# Altium PCB Copy of TQ210_BOARD_V4-20121031.PcbDoc (part 1 of 8)
Units mm, origin at the board's own origin, x right, y up, seen from the top; angles counter-clockwise.
Board outline 191.2 x 131.27 mm, 2 copper layers (TopLayer, BottomLayer); 362 components, 455 nets, 1594 pads, 630 vias.
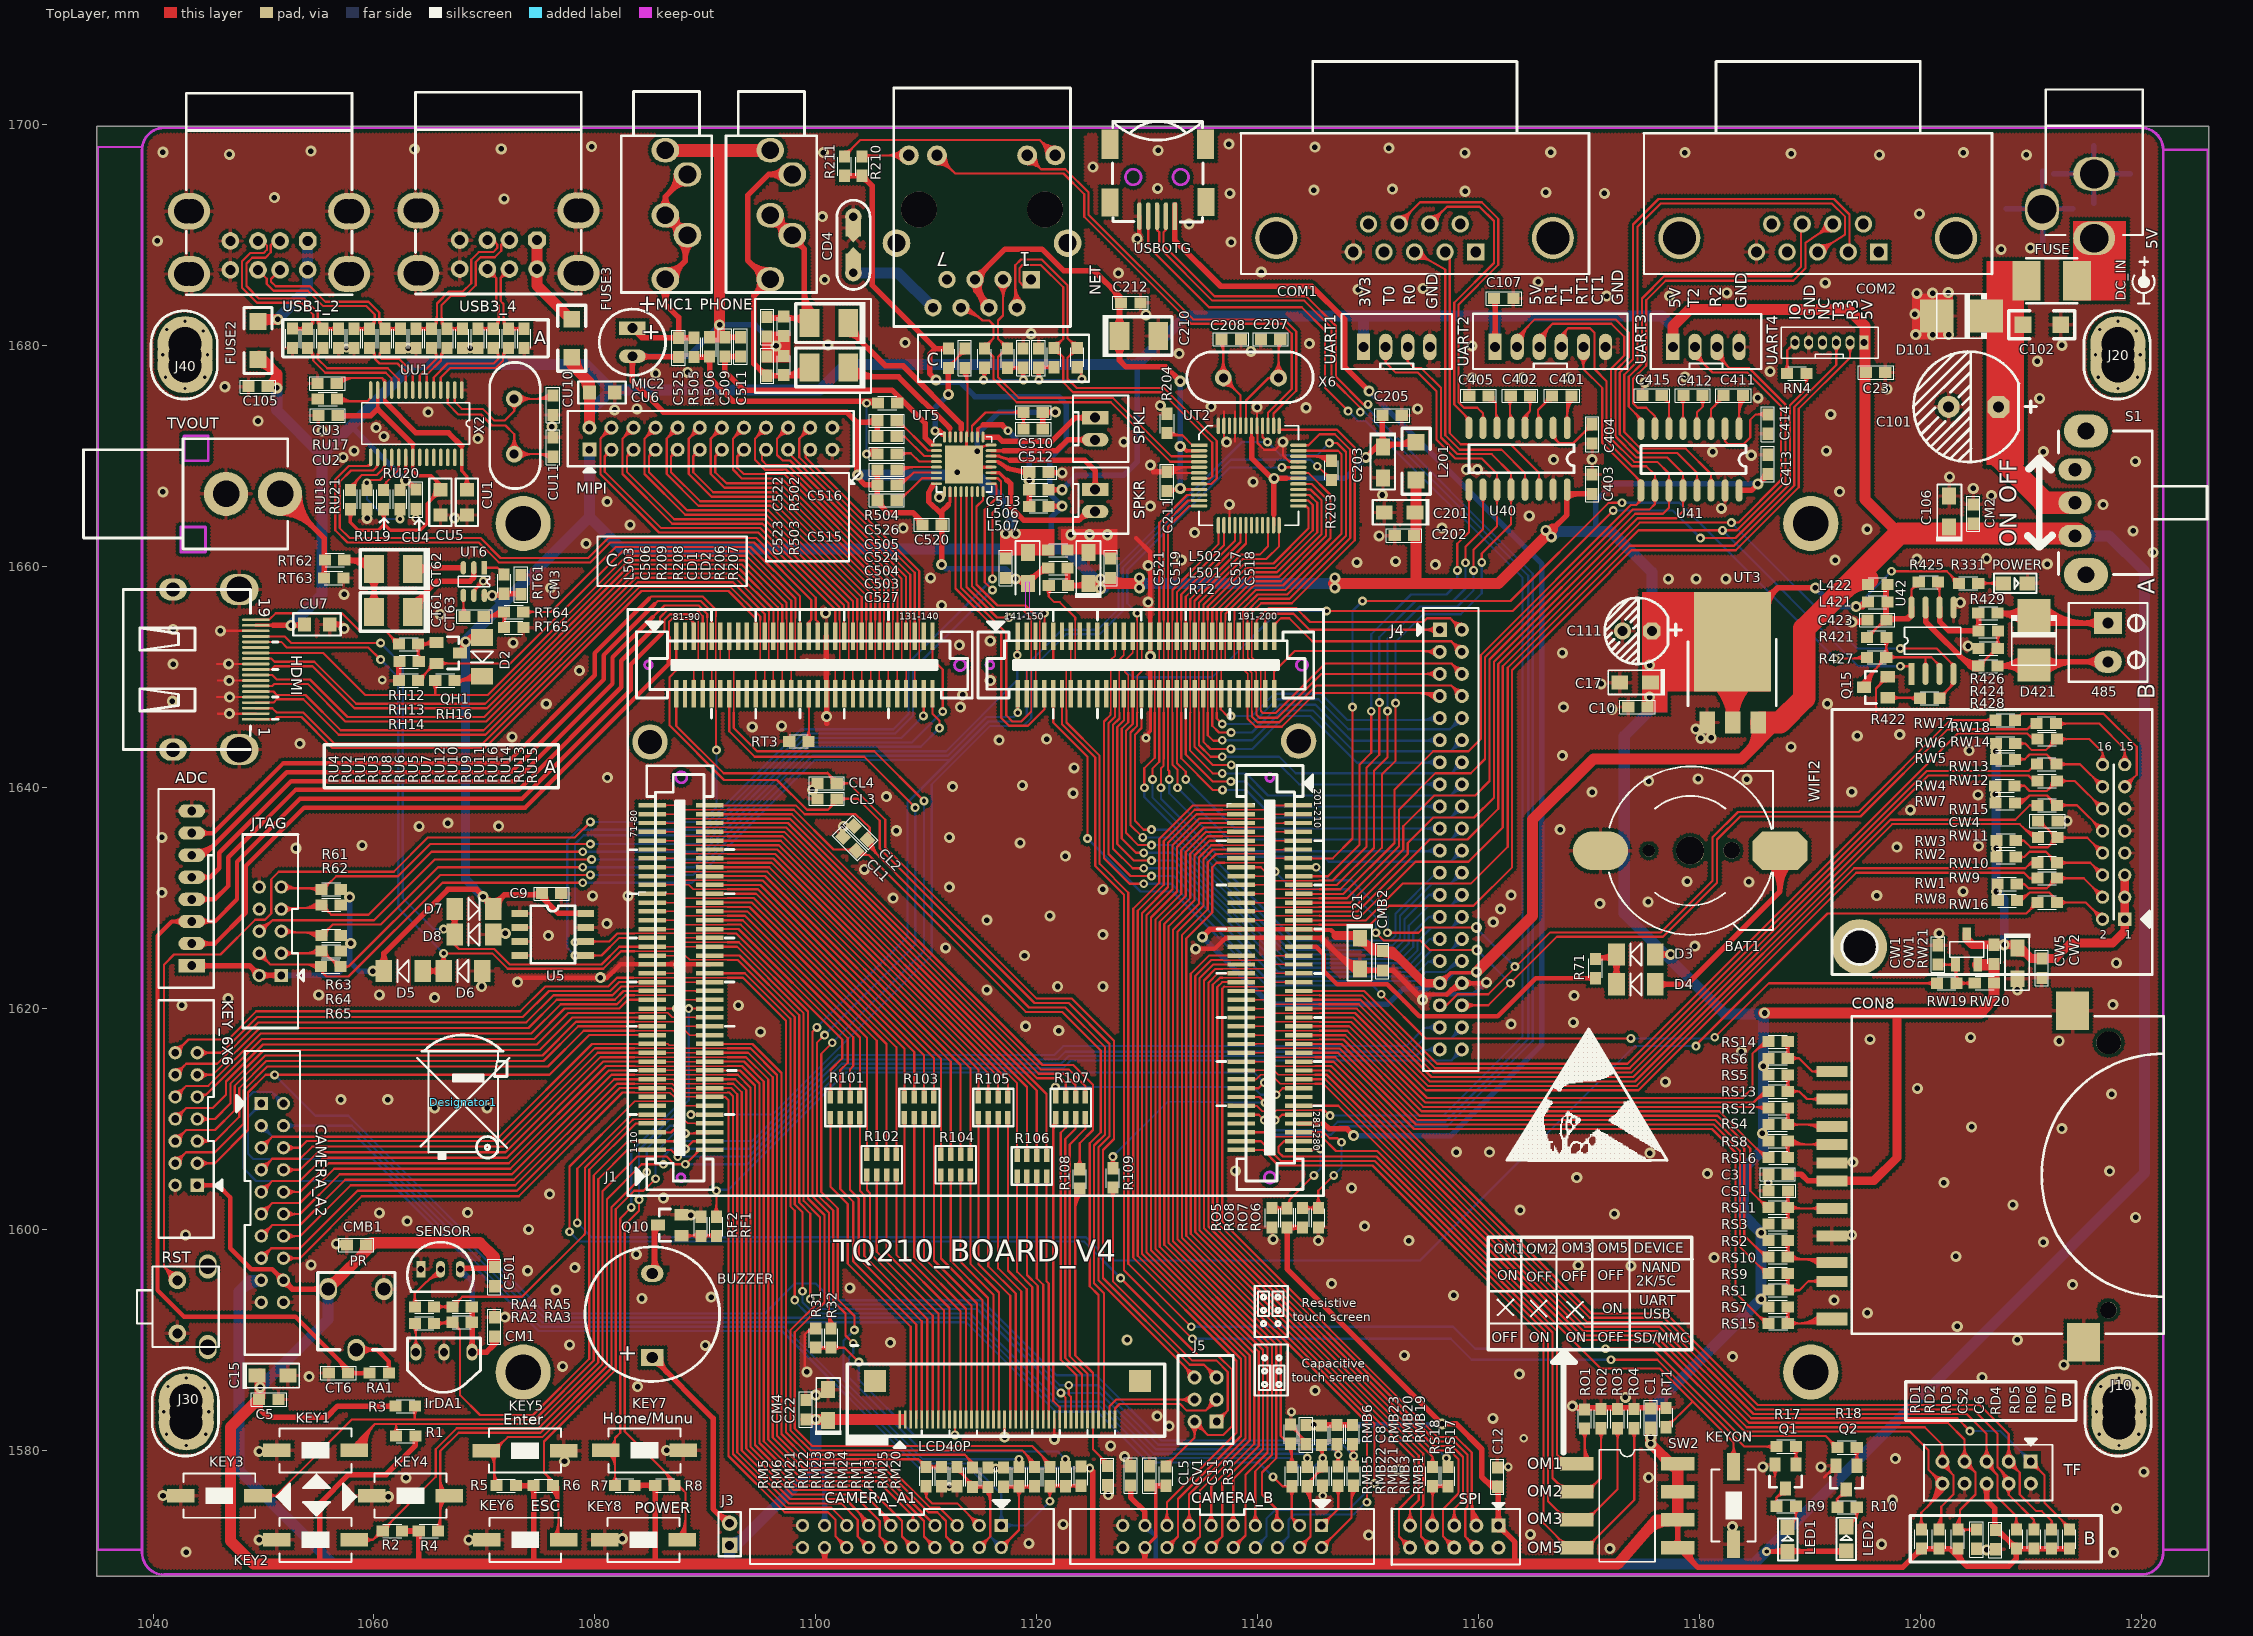
[diagram p0: TopLayer view]
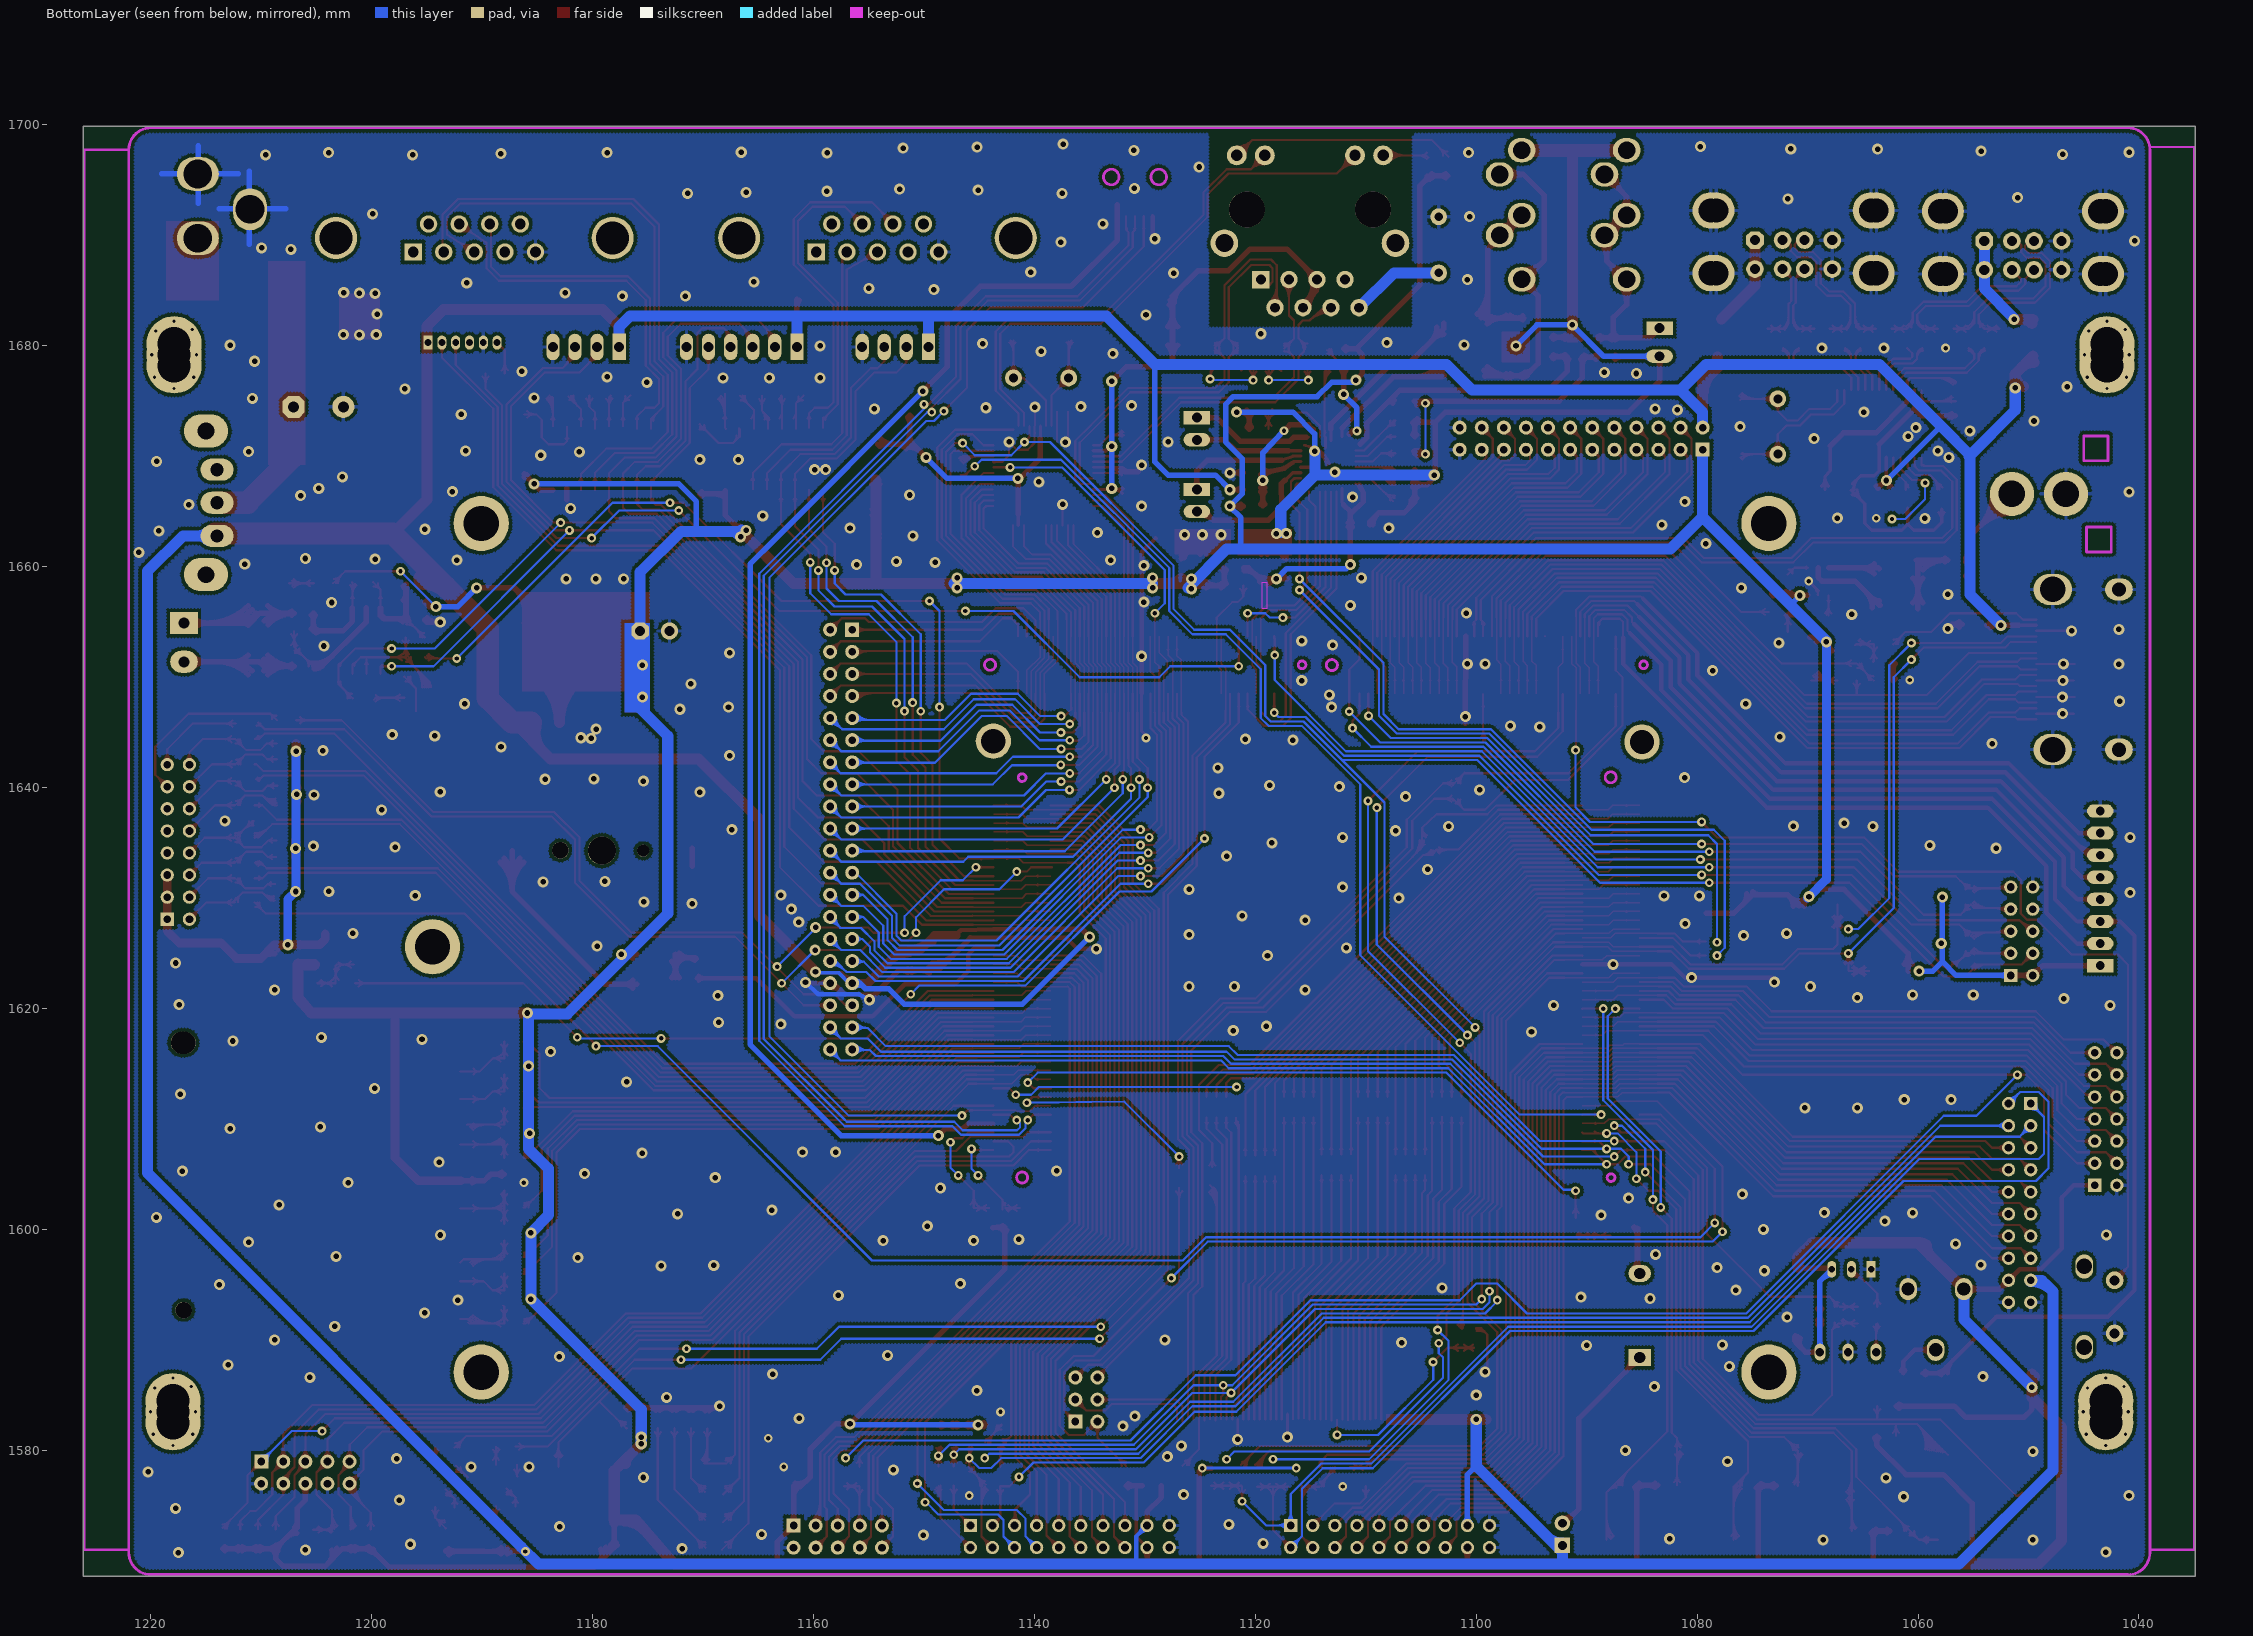
[diagram p1: BottomLayer view, seen from below]

## Layer stack, top to bottom
TopSolder: solder mask 0.0102, Solder Resist, Dk 3.5
TopLayer: signal copper 0.0356
Dielectric1: dielectric 0.32, FR-4, Dk 4.8
BottomLayer: signal copper 0.0356
BottomSolder: solder mask 0.0102, Solder Resist, Dk 3.5

## Board outline
1034.9,1568.607 1226.1,1568.607 1226.1,1699.877 1034.9,1699.877

## Design rules (kind name [scope] priority, off if disabled: settings)
AssemblyTestPointUsage [All] p0: scope1count=1 scope1_0_kind=Board scope1_0_value=Board scope2count=1 scope2_0_kind=Board scope2_0_value=Board commentlength=0
AssemblyTestpoint [All] p0: scope1count=1 scope1_0_kind=Board scope1_0_value=Board scope2count=1 scope2_0_kind=Board scope2_0_value=Board commentlength=0
Clearance [All] p0: scope1count=1 scope1_0_kind=Board scope1_0_value=Board scope2count=1 scope2_0_kind=Board scope2_0_value=Board commentlength=0 gap=0.102
Clearance Clearance_2 [All] p0 off: scope1count=1 scope1_0_kind=Board scope1_0_value=Board scope2count=1 scope2_0_kind=Board scope2_0_value=Board commentlength=0 gap=0.2
Clearance Clearance_1 [All] p0 off: scope1count=1 scope1_0_kind=Board scope1_0_value=Board scope2count=1 scope2_0_kind=Board scope2_0_value=Board commentlength=47 gap=0.3 // Protel DXP Scope 1 Expression Was: (InPoly)
Clearance Clearance_1 [(InPoly)] p1: gap=0.3 ignorepadtopadclearanceinfootprint=FALSE
Clearance Clearance_2 [All] p2 off: gap=0.2 ignorepadtopadclearanceinfootprint=FALSE
Clearance [All] p3: gap=0.102 ignorepadtopadclearanceinfootprint=FALSE
ComponentClearance [All] p0 off: scope1count=1 scope1_0_kind=Board scope1_0_value=Board scope2count=1 scope2_0_kind=Board scope2_0_value=Board commentlength=0 gap=0.254 collisioncheckmode=3
ComponentClearance [All] p1 off: gap=0.254 collisioncheckmode=3 verticalgap=0.254 showdistances=FALSE
DiffPairsRouting [All] p0: scope1count=1 scope1_0_kind=Board scope1_0_value=Board scope2count=1 scope2_0_kind=Board scope2_0_value=Board commentlength=0
FabricationTestPointUsage TestPointUsage [All] p0: scope1count=1 scope1_0_kind=Board scope1_0_value=Board scope2count=1 scope2_0_kind=Board scope2_0_value=Board commentlength=0 valid=0 allowmultiple=FALSE
FabricationTestPointUsage TestPointUsage [All] p1: valid=0 allowmultiple=FALSE
FabricationTestpoint Testpoint [All] p0: scope1count=1 scope1_0_kind=Board scope1_0_value=Board scope2count=1 scope2_0_kind=Board scope2_0_value=Board commentlength=0 side=3 testpointundercomponent=TRUE minsize=1.016 maxsize=2.54 preferedsize=1.524 minholesize=0.508 maxholesize=1.016 preferedholesize=0.813 testpointgrid=0.025
FabricationTestpoint Testpoint [All] p1: side=3 testpointundercomponent=TRUE minsize=1.016 maxsize=2.54 preferedsize=1.524 minholesize=0.508 maxholesize=1.016 preferedholesize=0.813 testpointgrid=0.025 allowsidetop=TRUE allowsidebottom=TRUE usegrid=TRUE gridtolerance=0
FanoutControl Fanout_BGA [All] p0 off: scope1count=1 scope1_0_kind=Board scope1_0_value=Board scope2count=1 scope2_0_kind=Board scope2_0_value=Board commentlength=69 // Protel DXP Scope 1 Expression Was: IsBGA   Fanout_BGA (Default Rule)
FanoutControl Fanout_LCC [All] p0 off: scope1count=1 scope1_0_kind=Board scope1_0_value=Board scope2count=1 scope2_0_kind=Board scope2_0_value=Board commentlength=69 // Protel DXP Scope 1 Expression Was: IsLCC   Fanout_LCC (Default Rule)
FanoutControl Fanout_SOIC [All] p0 off: scope1count=1 scope1_0_kind=Board scope1_0_value=Board scope2count=1 scope2_0_kind=Board scope2_0_value=Board commentlength=71 // Protel DXP Scope 1 Expression Was: IsSOIC   Fanout_SOIC (Default Rule)
FanoutControl Fanout_Small [All] p0 off: scope1count=1 scope1_0_kind=Board scope1_0_value=Board scope2count=1 scope2_0_kind=Board scope2_0_value=Board commentlength=84 // Protel DXP Scope 1 Expression Was: (CompPinCount < 5)   Fanout_Small (Default Rule)
FanoutControl Fanout_Default [All] p0: scope1count=1 scope1_0_kind=Board scope1_0_value=Board scope2count=1 scope2_0_kind=Board scope2_0_value=Board commentlength=30 // Fanout_Default (Default Rule)
Height [All] p0: scope1count=1 scope1_0_kind=Board scope1_0_value=Board scope2count=1 scope2_0_kind=Board scope2_0_value=Board commentlength=0
HoleSize [All] p0: scope1count=1 scope1_0_kind=Board scope1_0_value=Board scope2count=1 scope2_0_kind=Board scope2_0_value=Board commentlength=0 absolutevalues=TRUE maxlimit=8 minlimit=0.025 maxpercent=80.000 minpercent=20.000
HoleSize [All] p1: absolutevalues=TRUE maxlimit=8 minlimit=0.025 maxpercent=80.000 minpercent=20.000
HoleToHoleClearance [All] p0: scope1count=1 scope1_0_kind=Board scope1_0_value=Board scope2count=1 scope2_0_kind=Board scope2_0_value=Board commentlength=0
LayerPairs [All] p0: scope1count=1 scope1_0_kind=Board scope1_0_value=Board scope2count=1 scope2_0_kind=Board scope2_0_value=Board commentlength=0 enforce=TRUE
MinimumSolderMaskSliver [All] p0: scope1count=1 scope1_0_kind=Board scope1_0_value=Board scope2count=1 scope2_0_kind=Board scope2_0_value=Board commentlength=0
NetAntennae [All] p0: scope1count=1 scope1_0_kind=Board scope1_0_value=Board scope2count=1 scope2_0_kind=Board scope2_0_value=Board commentlength=0
PasteMaskExpansion [All] p0: scope1count=1 scope1_0_kind=Board scope1_0_value=Board scope2count=1 scope2_0_kind=Board scope2_0_value=Board commentlength=0 expansion=0
PlaneClearance [All] p0: scope1count=1 scope1_0_kind=Board scope1_0_value=Board scope2count=1 scope2_0_kind=Board scope2_0_value=Board commentlength=0 clearance=0.508
PlaneConnect [All] p0: scope1count=1 scope1_0_kind=Board scope1_0_value=Board scope2count=1 scope2_0_kind=Board scope2_0_value=Board commentlength=0 planeconnectstyle=Relief reliefexpansion=0.508 reliefentries=4 reliefconductorwidth=0.254 reliefairgap=0.254
PolygonConnect [All] p0: scope1count=1 scope1_0_kind=Board scope1_0_value=Board scope2count=1 scope2_0_kind=Board scope2_0_value=Board commentlength=0 connectstyle=Relief reliefconductorwidth=0.3 reliefentries=4 polygonreliefangle="90 Angle"
PolygonConnect [All] p1: connectstyle=Relief reliefconductorwidth=0.3 reliefentries=4 polygonreliefangle="90 Angle" airgapwidth=0.254
RoutingCorners [All] p0: scope1count=1 scope1_0_kind=Board scope1_0_value=Board scope2count=1 scope2_0_kind=Board scope2_0_value=Board commentlength=0 cornerstyle=45-Degree minsetback=2.54 maxsetback=2.54
RoutingLayers [All] p0: scope1count=1 scope1_0_kind=Board scope1_0_value=Board scope2count=1 scope2_0_kind=Board scope2_0_value=Board commentlength=0 top layer=Horizontal bottom layer=Vertical
RoutingPriority [All] p0: scope1count=1 scope1_0_kind=Board scope1_0_value=Board scope2count=1 scope2_0_kind=Board scope2_0_value=Board commentlength=0
RoutingTopology [All] p0: scope1count=1 scope1_0_kind=Board scope1_0_value=Board scope2count=1 scope2_0_kind=Board scope2_0_value=Board commentlength=0 topology=Shortest
RoutingVias [All] p0: scope1count=1 scope1_0_kind=Board scope1_0_value=Board scope2count=1 scope2_0_kind=Board scope2_0_value=Board commentlength=0 holewidth=0.711 width=1.27 viastyle="Through Hole" minholewidth=0.711 minwidth=1.27 maxholewidth=5 maxwidth=5
RoutingVias [All] p1: holewidth=0.711 width=1.27 viastyle="Through Hole" minholewidth=0.711 minwidth=1.27 maxholewidth=5 maxwidth=5
ShortCircuit [All] p0: scope1count=1 scope1_0_kind=Board scope1_0_value=Board scope2count=1 scope2_0_kind=Board scope2_0_value=Board commentlength=0 allowed=FALSE
SilkToBoardRegionClearance [All] p0: scope1count=1 scope1_0_kind=Board scope1_0_value=Board scope2count=1 scope2_0_kind=Board scope2_0_value=Board commentlength=0
SilkToSilkClearance [All] p0: scope1count=1 scope1_0_kind=Board scope1_0_value=Board scope2count=1 scope2_0_kind=Board scope2_0_value=Board commentlength=0
SilkToSolderMaskClearance [All] p0 off: scope1count=1 scope1_0_kind=Board scope1_0_value=Board scope2count=1 scope2_0_kind=Board scope2_0_value=Board commentlength=44 // Protel DXP Scope 1 Expression Was: IsPad
SolderMaskExpansion [All] p0: scope1count=1 scope1_0_kind=Board scope1_0_value=Board scope2count=1 scope2_0_kind=Board scope2_0_value=Board commentlength=0 expansion=0.102
SolderMaskExpansion [All] p1: expansion=0.102
UnRoutedNet [All] p0: scope1count=1 scope1_0_kind=Board scope1_0_value=Board scope2count=1 scope2_0_kind=Board scope2_0_value=Board commentlength=0
UnpouredPolygon [All] p0: scope1count=1 scope1_0_kind=Board scope1_0_value=Board scope2count=1 scope2_0_kind=Board scope2_0_value=Board commentlength=0
Width Width_7 [All] p0 off: scope1count=1 scope1_0_kind=Net scope1_0_value=VDD5V scope2count=1 scope2_0_kind=Board scope2_0_value=Board commentlength=0 maxlimit=0.5 minlimit=0.5 preferedwidth=0.5
Width Width_2 [All] p0 off: scope1count=1 scope1_0_kind=Net scope1_0_value=XMMC1DATA3 scope2count=1 scope2_0_kind=Board scope2_0_value=Board commentlength=0 maxlimit=0.5 minlimit=0.5 preferedwidth=0.5
Width [All] p0 off: scope1count=1 scope1_0_kind=Board scope1_0_value=Board scope2count=1 scope2_0_kind=Board scope2_0_value=Board commentlength=0 maxlimit=0.152 minlimit=0.127 preferedwidth=0.135
Width Width_1 [All] p0: scope1count=1 scope1_0_kind=Board scope1_0_value=Board scope2count=1 scope2_0_kind=Board scope2_0_value=Board commentlength=0 maxlimit=3 minlimit=0.2 preferedwidth=0.5
Width Width_2 [InNet('XMMC1DATA3')] p1 off: maxlimit=0.5 minlimit=0.5 preferedwidth=0.5
Width Width_7 [InNet('VDD5V')] p2 off: maxlimit=0.5 minlimit=0.5 preferedwidth=0.5
Width [All] p3 off: maxlimit=0.152 minlimit=0.127 preferedwidth=0.135
Width Width_1 [All] p4: maxlimit=3 minlimit=0.2 preferedwidth=0.5
26 further rules are at their usual default settings.

## Components (designator, comment, footprint, x,y, rotation, side; value= is the part's Value field where it differs from the comment)
485 "CON2_3.5" CN2-3.5-180 1217,1654.9 r90 top
ADC "CON8" DIP8_2.0 1043.5,1623.9 r90 top
BAT1 "BATTERY" BAT600 1187.3,1634.3 r90 top
BUZZER "BUZZER" BUZZER 1085.2,1588.4 r90 top
C1 "104" C_0603#1 1175.6,1582.05 r90 top
C3 "104" C_0603#1 1188,1605 r180 top
C5 "104" C_0603#1 1049.6,1584.6 r0 top
C6 "104" C_0603#1 1206.8,1572.8 r270 top
C8 "104" C_0603#2 1144.4,1582.3 r270 top
C9 "104" C_0603#1 1075.2,1630.4 r0 top
C10 "104" C_0603#2 1175.3,1647.3 r180 top
C11 "104" C_0603#3 1130.2,1576.8 r90 top
C12 "104" C_0603#3 1161.7,1576.7 r90 top
C15 "22uF/6.3V" 3216A#1 1049.4,1586.8 r0 top
C17 "10uF/16V" 3216A#1 1175.6,1649.5 r180 top
C21 "10uF/16V" 3216A#1 1149.278,1626.384 r270 top
C22 "10uF/16V" 3216A#2 1101.1,1582.7 r90 top
C23 "104" C_0603#4 1195.1,1677.6 r0 top
C101 "220uF/50V" 1000UF 1202.6,1674.5 r0 top
C102 "10uF/25V" 1206#1 1209.3,1681.9 r0 top
C105 "104" C_0603#3 1050.4,1676.3 r180 top
C106 "10uF/16V" 3216a 1202.6,1663.6 r90 top
C107 "104" C_0603#3 1161.4,1684.3 r0 top
C111 "220uF/16V" 47U1 1175.7,1654.2 r180 top
C201 "22uF/6.3V" 3216A#3 1154.266,1664.923 r180 top
C202 "104" C_0603#1 1154.166,1662.823 r180 top
C203 "22uF/6.3V" 3216A#3 1151.354,1670.848 r270 top
C205 "104" C_0603#1 1151.3,1673.7 r0 top
C207 "22pF" C_0603#1 1140.3,1680.6 r0 top
C208 "22pF" C_0603#1 1138.5,1680.6 r180 top
C210 "100uF/6.3V" C_1210#1 1127.5,1680.9 r0 top
C211 "22pF" C_0603#1 1131.8,1668.6 r270 top
C212 "104" C_0603#1 1129.4,1683.9 r180 top
C401 "104" C_0603#1 1166.669,1675.48 r0 top
C402 "104" C_0603#1 1164.669,1675.48 r180 top
C403 "104" C_0603#1 1170.3,1666.6 r90 top
C404 "104" C_0603#1 1170.3,1672.9 r270 top
C405 "104" C_0603#1 1160.919,1675.48 r180 top
C411 "104" C_0603#1 1182.2,1675.5 r0 top
C412 "104" C_0603#1 1180.3,1675.5 r180 top
C413 "104" C_0603#1 1186.2,1668.4 r90 top
C414 "104" C_0603#1 1186.2,1673.8 r270 top
C415 "104" C_0603#1 1176.6,1675.5 r180 top
C423 "104" C_0603#5 1195.2,1655.2 r0 top
C501 "104" C_0603#2 1070.9,1596.6 r270 top
C503 "1uF" C_0603#1 1107.328,1667.424 r180 top
C504 "1uF" C_0603#1 1107.329,1668.778 r180 top
C505 "1uF" C_0603#1 1107.329,1671.778 r180 top
C506 "104" C_0603#1 1113.5,1678 r90 top
C509 "1uF" C_0603#1 1091.781,1679.033 r90 top
C510 "1uF" C_0603#1 1118.808,1673.973 r0 top
C511 "104" C_0603#1 1093.181,1679.033 r90 top
C512 "104" C_0603#1 1118.808,1672.473 r0 top
C513 "104" C_0603#1 1119.328,1668.524 r0 top
C515 "100uF/6.3V" C_1210#1 1102.939,1678.054 r180 top
C516 "100uF/6.3V" C_1210#1 1102.939,1682.054 r180 top
C517 "22uF/6.3V" 3216A#3 1124.7,1658.5 r90 top
C518 "104" C_0603#1 1126.7,1659 r90 top
C519 "22uF/6.3V" 3216A#4 1119.2,1658.5 r90 top
C520 "104" C_0603#1 1111.4,1663.8 r180 top
C521 "104" C_0603#1 1117.2,1659 r90 top
C522 "220pF" C_0603#1 1095.6,1682.6 r270 top
C523 "220pF" C_0603#1 1095.6,1677.3 r90 top
C524 "1uF" C_0603#1 1107.328,1670.224 r180 top
C525 "220pF" C_0603#1 1087.574,1680.736 r270 top
C526 "1uF" C_0603#1 1107.328,1673.224 r180 top
C527 "1uF" C_0603#1 1107.328,1666.024 r180 top
CAMERA_A1 "CAM_2.0" IDC20S_2.0 1116.8,1573.2 r180 top
CAMERA_A2 "CAM_2.0" IDC20S_2.0 1049.8,1611.4 r270 top
CAMERA_B "CAM_2.0" IDC20S_2.0 1145.8,1573.2 r180 top
CD1 "104" C_0603#1 1118.777,1678.015 r90 top
CD2 "104" C_0603#1 1120.177,1678.015 r90 top
CD4 "102/1kv" RESD1 1103.4,1686.6 r90 top
CL1 "1nF(NC)" C_0603#6 1103.7,1634.3 r135 top
CL2 "1nF(NC)" C_0603#6 1104.7,1635.3 r135 top
CL3 "1nF(NC)" C_0603#6 1101.9,1639 r180 top
CL4 "1nF(NC)" C_0603#6 1101.9,1640.4 r180 top
CL5 "22pF" C_0603#1 1126.4,1578.6 r270 top
CM1 "104" C_0603#1 1070.9,1590.3 r90 top
CM2 "104" C_0603#1 1204.8,1663.9 r90 top
CM3 "104" C_0603#7 1073.3,1657.5 r90 top
CM4 "104" C_0603#7 1099.1,1582.8 r90 top
CMB1 "104" C_0603#1 1059.3,1598.6 r180 top
CMB2 "104" C_0603#1 1151.3,1625.2 r270 top
COM1 "BOXCONN_DB9" DB9RA/M 1159.75,1688.5 r180 top
COM2 "BOXCONN_DB9" DB9RA/M 1196.25,1688.5 r180 top
CON8 "SD/MMC CARD" SD-5011 1191.995,1611.805 r0 top locked
CS1 "22pF" C_0603#8 1188,1603.5 r180 top
CS2 "22pF" C_0603#8 1205.1,1572.819 r270 top
CT6 "104" C_0603#1 1055.9,1587 r0 top
CT61 "47uF/10V" C_1210#2 1063.5,1655.9 r180 top
CT62 "47uF/10V" C_1210#2 1063.5,1659.8 r180 top
CT63 "104" C_0603#9 1068.2,1655.5 r0 top
CU1 "10uF" 0805C#1 1068.4,1667 r0 top
CU2 "104" C_0603#8 1056.7,1673.7 r180 top
CU3 "104" C_0603#8 1054.9,1676.6 r0 top
CU4 "104" C_0603#1 1063.798,1666.997 r270 top
CU5 "10uF" 0805C#2 1066,1667 r0 top
CU6 "10uF" 0805C#3 1079.5,1675.8 r270 top
CU7 "10uF" 0805C#4 1053.7,1654.8 r270 top
CU10 "22pF" C_0603#8 1076.202,1673.769 r90 top
CU11 "22pF" C_0603#8 1076.2,1671.7 r270 top
CV1 "104" C_0603#3 1128.5,1576.8 r90 top
CW1 "1nF(NC)" C_0603#10 1201.6,1624 r90 top
CW2 "104" C_0603#10 1211,1622.8 r90 top
CW4 "22pF" C_0603#11 1212.4,1637 r180 top
CW5 "22uF/6.3V" 3216A#5 1208.8,1625.5 r270 top
D2 "1N4148" D1206 1069.8,1653.6 r270 top
D3 "1N4148" D1206 1176,1624.9 r180 top
D4 "1N4148" D1206 1176,1622.2 r180 top
D5 "1N4148" D1206 1064.4,1623.4 r180 top
D6 "1N4148" D1206 1069.8,1623.4 r180 top
D7 "1N4148" D1206 1067.3,1629 r0 top
D8 "1N4148" D1206 1070.8,1626.7 r180 top
D101 "SMBJ6.8A" SMBJ_SMD 1201.5,1682.7 r180 top
D421 "SMBJ6.8A" SMBJ_SMD 1210.3,1651.1 r270 top
DC_IN "DC-05-2.1" DC-JACK 1215.75,1689.75 r90 top
Designator1 "Comment" LAJITONG 1068.1,1611.5 r0 top
FUSE "2.6A" FUSE 1214.2,1685.9 r180 top
FUSE2 "2A" 1206#2 1049.5,1682.2 r270 top
FUSE3 "2A" 1206#1 1077.9,1682.4 r270 top
HDMI "HDMI_A" HDMI 1049.3,1646.2 r0 top
IrDA1 "HS0038B" IRM3638 1063.8,1588.9 r0 top
J1 "CON280" CON280_SMD_BOT 1085.2,1607.2 r0 top locked
J3 "CON2" SIP2_2.0 1092.2,1571.4 r90 top
J4 "HEADER 20X2" IDC40P_2.00 1156.5,1654.3 r270 top
J5 "CON6_DIP" CON6_2.0 1136.3,1582.6 r90 top
J10 "TP" DWK 1217.998,1583.497 r0 top locked
J20 "TP" DWK 1217.898,1679.197 r0 top locked
J30 "TP" DWK 1042.998,1583.497 r0 top locked
J40 "TP" DWK 1042.898,1679.197 r0 top locked
JTAG "HEADER 5X2" IDC10S 1051.6,1623 r90 top
KEY1 "KEY" SW-PB2 1058.2,1580 r270 top
KEY2 "KEY" SW-PB2 1058.2,1571.9 r270 top
KEY3 "KEY" SW-PB2 1049.5,1575.9 r270 top
KEY4 "KEY" SW-PB2 1066.8,1575.9 r270 top
KEY5 "KEY" SW-PB2 1070.176,1579.976 r90 top
KEY6 "KEY" SW-PB2 1077.2,1571.9 r270 top
KEY7 "KEY" SW-PB2 1081,1580 r90 top
KEY8 "KEY" SW-PB2 1087.9,1571.9 r270 top
KEY_6X6 "HEADER 7X2" IDC14S_2.0 1044,1604 r90 top
KEYON "KEY" SW-PB2 1183.098,1578.502 r0 top
L201 "10uH" 1206#2 1154.354,1667.848 r90 top
L421 "0R" R_0603#1 1195.3,1656.8 r0 top
L422 "0(NC)" R_0603#1 1195.3,1658.4 r0 top
L501 "0" R_0603#2 1122.8,1659.9 r180 top
L502 "0" R_0603#2 1122.8,1661.5 r180 top
L503 "F.B/120" R_0603#2 1112,1678 r90 top
L506 "0" R_0603#2 1119.328,1666.976 r0 top
L507 "0(NC)" R_0603#2 1119.328,1665.476 r0 top
LCD40P "LCD40P" FPC0.5-SMT-40P 1107.6,1582.8 r0 top
LED1 "" LED_0805#1 1187.991,1573.041 r270 top
LED2 "" LED_0805#1 1193.3,1573.1 r270 top
MIC1 "PJ-215-B" PJ-215-B 1086.385,1697.725 r270 top
MIC2 "MIC" MIC 1083.4,1681.6 r270 top
MIPI "CON24(NC)" IDC24P_2.0 1079.5,1670.6 r0 top locked
NET "HR911105A" HR911105A 1119.5,1686 r90 top
PHONE "PJ-215-B" PJ-215-B 1095.885,1697.725 r270 top
POWER "RED" LED_0805#2 1209.7,1658.5 r180 top
PR "3K" RP2 1060.9,1594.6 r270 top
Q1 "S8050" S9013SMD#1 1187.791,1576.541 r180 top
Q2 "S8050" S9013SMD#1 1193.3,1576.45 r180 top
Q10 "S8050" S9013SMD#1 1085.7,1600.4 r90 top
Q15 "S8050" S9013SMD#1 1194.9,1649.1 r90 top
QH1 "S8050" S9013SMD#2 1067.8,1652.2 r270 top
QW1 "AP2305GN(NC)" SOT23-3 1203.2,1624 r0 top
R1 "10K" R_0603#2 1062,1581.3 r0 top
R2 "10K" R_0603#2 1060.8,1572.7 r0 top
R3 "10K" R_0603#3 1063.692,1584.011 r180 top
R4 "10K" R_0603#2 1065.8,1572.7 r180 top
R5 "10K" R_0603#2 1071.1,1576.8 r0 top
R6 "10K" R_0603#2 1076.2,1576.8 r180 top
R7 "10K" R_0603#2 1081.824,1576.824 r0 top
R8 "10K" R_0603#2 1087.224,1576.824 r180 top
R9 "1K" R_0603#2 1186.991,1574.941 r0 top
R10 "1K" R_0603#2 1192.5,1574.85 r0 top
R17 "10K" R_0603#2 1186.991,1580.341 r0 top
R18 "10K" R_0603#2 1192.5,1580.25 r0 top
R31 "0" R_0603#2 1100,1589.3 r90 top
R32 "0(NC)" R_0603#2 1101.4,1589.3 r90 top
R33 "0(NC)" R_0603#2 1131.7,1576.8 r90 top
R61 "10K" R_0603#4 1057,1630.8 r180 top
R62 "10K" R_0603#4 1057,1629.4 r180 top
R63 "10K" R_0603#4 1057,1626.6 r180 top
R64 "10K" R_0603#4 1057,1625.2 r180 top
R65 "1K" R_0603#4 1055.2,1623.8 r0 top
R71 "10K" R_0603#2 1170.6,1624.5 r270 top
R101 "22R" 8P4R_0603 1104,1612 r270 top
R102 "22R" 8P4R_0603 1107.3,1606.8 r270 top
R103 "22R" 8P4R_0603 1110.7,1612 r270 top
R104 "22R" 8P4R_0603 1114,1606.8 r270 top
R105 "22R" 8P4R_0603 1117.4,1612 r270 top
R106 "22R" 8P4R_0603 1120.9,1606.7 r270 top
R107 "22R" 8P4R_0603 1124.411,1612 r270 top
R108 "22" R_0603#2 1123.9,1603.7 r90 top
R109 "22" R_0603#2 1126.9,1603.8 r90 top
R203 "0" R_0603#2 1146.7,1669.6 r270 top
R204 "6.8K(1%)" R_0603#2 1131.8,1672.1 r90 top
R206 "51" R_0603#2 1121.577,1679.815 r270 top
R207 "51" R_0603#2 1123.677,1679.815 r270 top
R208 "51" R_0603#2 1117.377,1678.015 r90 top
R209 "51" R_0603#2 1115.277,1678.015 r90 top
R210 "1K" R_0603#2 1102.6,1695.4 r90 top
R211 "1K" R_0603#2 1104.2,1695.4 r90 top
R331 "1K" R_0603#5 1203.5,1658.5 r0 top
R421 "5.1K" R_0603#1 1195.2,1653.6 r0 top
R422 "1K" R_0603#1 1200,1648.1 r0 top
R424 "2K" R_0603#1 1207,1652.6 r180 top
R425 "2K" R_0603#1 1201.6,1658.6 r180 top
R426 "120" R_0603#1 1205.3,1654.2 r0 top
R427 "0(NC)" R_0603#1 1196.9,1651.8 r180 top
R428 "22" R_0603#2 1207,1651 r180 top
R429 "22" R_0603#2 1207,1655.8 r180 top
R502 "47K" R_0603#2 1097.1,1680.9 r90 top
R503 "47K" R_0603#2 1097.1,1679.1 r270 top
R504 "2.2K" R_0603#2 1105.628,1674.824 r0 top
R505 "0" R_0603#2 1088.981,1680.733 r270 top
R506 "47K(NC)" R_0603#2 1090.381,1679.033 r90 top
RA1 "100" R_0603#2 1059.6,1587 r0 top
RA2 "0" R_0603#2 1063.7,1591.5 r0 top
RA3 "10K" R_0603#2 1067.1,1591.6 r0 top
RA4 "0" R_0603#2 1063.7,1593 r0 top
RA5 "10K" R_0603#2 1067.1,1593 r0 top
RD1 "10K" R_0603#2 1200.1,1571.1 r90 top
RD2 "10K" R_0603#2 1201.7,1571.1 r90 top
RD3 "10K" R_0603#2 1203.4,1571.1 r90 top
RD4 "10K" R_0603#2 1208.7,1571.1 r90 top
RD5 "10K" R_0603#2 1210.3,1571.1 r90 top
RD6 "10K" R_0603#2 1211.9,1571.1 r90 top
RD7 "10K" R_0603#2 1213.5,1571.1 r90 top
RF1 "100" R_0603#5 1091,1599.4 r90 top
RF2 "5.1K" R_0603#5 1089.6,1599.4 r90 top
RH12 "10K" R_0603#5 1064,1653 r180 top
RH13 "10K" R_0603#5 1062.3,1651.4 r0 top
RH14 "100K" R_0603#5 1064,1649.7 r180 top
RH16 "1.5K" R_0603#2 1067.3,1649.7 r180 top
RM1 "0(NC)" R_0603#2 1119.8,1576.748 r90 top
RM3 "0(NC)" R_0603#2 1121.2,1576.748 r90 top
RM5 "0" R_0603#2 1110,1578.5 r270 top
RM6 "10K" R_0603#2 1111.4,1578.5 r270 top
RM19 "4.7K" R_0603#5 1117,1578.448 r270 top
RM20 "4.7K" R_0603#5 1124,1578.548 r270 top
RM21 "10K" R_0603#5 1112.8,1576.752 r90 top
RM22 "0" R_0603#2 1114.2,1578.448 r270 top
RM23 "10K(NC)" R_0603#2 1115.6,1578.448 r270 top
RM24 "0" R_0603#2 1118.4,1576.748 r90 top
RM25 "0" R_0603#2 1122.6,1576.748 r90 top
RMB1 "0" R_0603#2 1148.7,1576.8 r90 top
RMB3 "0" R_0603#2 1147.3,1576.8 r90 top
RMB5 "0" R_0603#2 1143.1,1578.5 r270 top
RMB6 "10K" R_0603#2 1143,1580.6 r90 top
RMB19 "4.7K(NC)" R_0603#2 1148.6,1582.3 r270 top
RMB20 "4.7K(NC)" R_0603#2 1147.2,1582.3 r270 top
RMB21 "10K" R_0603#2 1145.9,1576.8 r90 top
RMB22 "0" R_0603#2 1144.5,1578.5 r270 top
RMB23 "10K(NC)" R_0603#2 1145.8,1580.5 r90 top
RN4 "0" R_0603#2 1189.7,1677.5 r180 top
RO1 "10K" R_0603#3 1169.611,1583.708 r270 top
RO2 "10K" R_0603#3 1171.111,1582.008 r90 top
RO3 "10K" R_0603#3 1172.611,1582.008 r90 top
RO4 "10K" R_0603#3 1174.111,1582.008 r90 top
RO5 "10K" R_0603#6 1141.3,1600.172 r90 top
RO6 "10K" R_0603#6 1145.5,1600.172 r90 top
RO7 "10K(NC)" R_0603#7 1144.1,1601.922 r270 top
RO8 "10K(NC)" R_0603#7 1142.7,1601.9 r270 top
RS1 "10K" R_0603#2 1186.25,1594.5 r0 top
RS2 "10K" R_0603#2 1186.25,1599 r0 top
RS3 "10K" R_0603#2 1186.25,1600.5 r0 top
RS4 "10K" R_0603#2 1186.25,1609.5 r0 top
RS5 "10K" R_0603#2 1186.25,1614 r0 top
RS6 "10K" R_0603#2 1186.25,1615.5 r0 top
RS7 "10K" R_0603#2 1186.25,1593 r0 top
RS8 "10K" R_0603#2 1186.25,1608 r0 top
RS9 "22" R_0603#2 1186.25,1596 r0 top
RS10 "22" R_0603#2 1186.25,1597.5 r0 top
RS11 "22" R_0603#2 1186.25,1602 r0 top
RS12 "22" R_0603#2 1186.25,1611 r0 top
RS13 "22" R_0603#2 1186.25,1612.5 r0 top
RS14 "22" R_0603#2 1186.25,1617 r0 top
RS15 "22" R_0603#2 1188,1591.5 r180 top
RS16 "22" R_0603#2 1188,1606.5 r180 top
RS17 "0" R_0603#2 1157.25,1578.5 r270 top
RS18 "0(NC)" R_0603#2 1155.85,1578.5 r270 top
RST "KEY" RST_KEY 1042.2,1590.6 r90 top
RT1 "0(NC)" R_0603#2 1177,1582.1 r90 top
RT2 "0(NC)" R_0603#2 1121.1,1658.3 r0 top
RT3 "10K" R_0603#2 1097.6,1644.2 r0 top
RT61 "4.7K" R_0603#8 1071.8,1659.3 r270 top
RT62 "75" R_0603#8 1057.3,1660.6 r180 top
RT63 "75" R_0603#8 1055.5,1659 r0 top
RT64 "0" R_0603#8 1073.5,1655.9 r180 top
RT65 "75" R_0603#8 1071.79,1654.5 r0 top
RU1 "22" R_0603#2 1055.4,1679.8 r90 top
RU2 "22" R_0603#2 1054,1679.8 r90 top
RU3 "15K" R_0603#2 1056.8,1679.8 r90 top
RU4 "15K" R_0603#2 1052.62,1679.815 r90 top
RU5 "22" R_0603#2 1061,1679.8 r90 top
RU6 "22" R_0603#2 1059.6,1679.8 r90 top
RU7 "15K" R_0603#2 1062.4,1679.8 r90 top
RU8 "15K" R_0603#2 1058.2,1679.8 r90 top
RU9 "22" R_0603#2 1066.6,1679.8 r90 top
RU10 "22" R_0603#2 1065.2,1679.8 r90 top
RU11 "15K" R_0603#2 1068,1679.8 r90 top
RU12 "15K" R_0603#2 1063.8,1679.8 r90 top
RU13 "22" R_0603#2 1072.2,1679.8 r90 top
RU14 "22" R_0603#2 1070.8,1679.8 r90 top
RU15 "15K" R_0603#2 1073.6,1679.8 r90 top
RU16 "15K" R_0603#2 1069.4,1679.8 r90 top
RU17 "2.7K (1%)" R_0603#7 1056.632,1675.159 r180 top
RU18 "100K" R_0603#2 1057.865,1666.958 r270 top
RU19 "100K" R_0603#2 1060.865,1666.958 r270 top
RU20 "47K" R_0603#2 1062.365,1666.958 r270 top
RU21 "100K" R_0603#2 1059.365,1666.958 r270 top
RW1 "10K" R_0603#2 1206.993,1631.269 r0 top
RW2 "10K" R_0603#2 1206.893,1633.719 r0 top
RW3 "10K" R_0603#2 1206.893,1635.219 r0 top
RW4 "10K" R_0603#2 1206.793,1640.169 r0 top
RW5 "10K" R_0603#2 1206.843,1642.569 r0 top
RW6 "10K" R_0603#2 1206.85,1644 r0 top
RW7 "10K" R_0603#9 1206.8,1638.6 r0 top
RW8 "10K" R_0603#9 1206.993,1629.769 r0 top
RW9 "22" R_0603#9 1210.6,1631.8 r0 top
RW10 "22" R_0603#9 1210.6,1633.2 r0 top
RW11 "22" R_0603#9 1210.643,1635.469 r0 top
RW12 "22" R_0603#9 1210.6,1640.6 r0 top
RW13 "22" R_0603#9 1210.563,1642.122 r0 top
RW14 "22" R_0603#9 1210.6,1644.4 r0 top
RW15 "22" R_0603#9 1210.6,1638.4 r0 top
RW16 "22" R_0603#9 1210.6,1629.6 r0 top
RW17 "22" R_0603#6 1208.6,1646.1 r180 top
RW18 "22" R_0603#6 1212.3,1645.8 r180 top
RW19 "4.7K(NC)" R_0603#6 1201.5,1622.3 r0 top
RW20 "4.7K(NC)" R_0603#6 1206.7,1622.3 r180 top
RW21 "0" R_0603#6 1206.7,1625.8 r270 top
S1 "SW SPDT" SW 1214,1662.8 r90 top
SENSOR "DS18B20" TO-92 1067.3,1596.4 r180 top
SPI "10P" IDC10P_2.00 1161.8,1573.2 r180 top
SPKL "CON-2" DIP2_2.0 1125.3,1673.5 r270 top
SPKR "CON-2" DIP2_2.0 1125.3,1667 r270 top
SW2 "NHDS_4" NHDS_4_2.54 1168.9,1578.8 r0 top
TF "10P" IDC10P_2.00 1210,1579 r180 top
TVOUT "AV-8.4-5A" TV 1051.5,1666.6 r0 top
U5 "AT24C02A" SOP-8 1073.2,1628.6 r0 top
U40 "SP3232EEN" SSOP16#1 1168.024,1672.577 r270 top
U41 "SP3232EEN" SSOP16#2 1183.6,1672.5 r270 top
U42 "MAX3485" SOP8 1199.2,1650.3 r90 top
UART1 "CON4" DIP4_2.0 1149.6,1679.9 r0 top
UART2 "CON6" DIP6_2.0 1161.5,1679.9 r0 top
UART3 "CON4" DIP4_2.0 1177.6,1679.9 r0 top
UART4 "CON6" DIP6_1.25 1194.9,1680.3 r180 top
USB1_2 "USB A/F" USBA_2 1054,1689.5 r180 top
USB3_4 "USB A/F" USBA_2 1074.766,1689.576 r180 top
USBOTG "MINIUSB" MINIUSB 1132.5,1691.75 r90 top
UT2 "DM9000AE" DM9000AE 1134.703,1671.004 r270 top
UT3 "AP1117-3.3" TO-252 1180.7,1645.9 r0 top
UT5 "WM8960GEFL" WM8960 1110.928,1671.024 r0 top
UT6 "NJM2561F1" NJM2561F1 1070,1659.9 r270 top
UU1 "FE1.1S" SSOP-28 1067.95,1676 r270 top
WIFI2 "CON16" IDC16_DIP_B 1218.5,1628.1 r0 top locked
X2 "12M" OSC2PR-1 1072.7,1670.2 r90 top
X6 "25M" OSC2PR-1 1141.9,1677.1 r180 top
? "" WEN 1170,1612 r0 top

## Footprints (in the part's own frame and the unit in brackets; to place one, negate y for a bottom-side part, rotate by r counter-clockwise, add the part's x,y. Pads: shape width x height; smd on the part's side, far side on the other; paste and mask are expansions set on the pad)
8P4R_0603 [mm]
  rect 1.2x0.5 smd: 1(0,0) 2(0,-0.889) 3(0,-1.778) 4(0,-2.667) 5(1.874,-2.667) 6(1.874,-1.778) 7(1.874,-0.889) 8(1.874,0)
  silkscreen extent -0.75,-3.15 2.65,0.5
47U1 [mil]
  oct 62x62 hole 35.43: 1(0.24,0.56)
  round 62 hole 35.43: 2(104.49,0.56)
  silkscreen extent -104,-117 168,119
0805C#1 [mm]
  rect 1.3x1.2 smd: 1(0.019,-0.027) 2(0.019,-2.313)
  silkscreen extent -0.99,-3.31 1.01,0.99
0805C#2 [mm]
  rect 1.3x1.2 smd: 1(0.018,-0.022) 2(0.018,-2.308)
  silkscreen extent -0.99,-3.3 1.01,1
0805C#3 [mm]
  rect 1.3x1.2 smd: 1(0.018,0.022) 2(0.018,2.308)
  silkscreen extent -0.99,-1 1.01,3.3
0805C#4 [mm]
  rect 1.3x1.2 smd: 1(0.021,0.018) 2(0.021,2.304)
  silkscreen extent -0.98,-1 1.02,3.3
1000UF [mm]
  oct 2x2 hole 1: 1(4.473,-0.015)
  round 2 hole 1: 2(-0.027,-0.015)
  silkscreen extent -3.2,-5.02 7.89,4.98
1206#1 [mil]
  rect 60x60 smd: 1(-0.21,0.39) 2(134.79,0.39)
  silkscreen extent -50,-50 185,50
1206#2 [mil]
  rect 60x60 smd: 1(0,0) 2(135,0)
  silkscreen extent -50,-50 185,50
3216A#1 [mil]
  rect 60x50 smd: 1(0.46,-0.58) 2(110.46,-0.58)
  silkscreen extent -51,-48 152,46
3216A#2 [mil]
  rect 60x50 smd: 1(0.35,-0.6) 2(110.35,-0.6)
  silkscreen extent -51,-48 151,46
3216A#3 [mil]
  rect 60x50 smd: 1(0,0) 2(110,0)
  silkscreen extent -51,-48 151,46
3216A#4 [mil]
  rect 60x50 smd: 1(0,0) 2(110,0)
  KeepOutLayer region: -90.23,8.85 -90.23,-7.61 3.77,-7.61 3.77,8.85
  silkscreen extent -40,-43 151,44
3216A#5 [mil]
  rect 60x50 smd: 1(0.2,-0.39) 2(110.2,-0.39)
  silkscreen extent -51,-48 151,46
3216a [mil]
  rect 60x50 smd: 1(0.35,-0.6) 2(110.35,-0.6)
  silkscreen extent -51,-48 151,46
BAT600 [mm]
  round 1.1 hole 1.1: 0(0,11.878)
  round 2.54 hole 2.54: 0(0,8.128)
  round 1.5 hole 1.5: 0(0.025,4.378)
  oct 3.5x5 smd: 1(0,0)
  oval 3.5x5 smd: 2(0,16.256)
  silkscreen extent -7.62,0.63 7.62,15.49
BUZZER [mil]
  rect 60x80 hole 40: 1(0,0)
  oval 60x80 hole 40: 2(300,0)
  silkscreen extent -85,-240 395,240
C_0603#1 [mm]
  rect 1.1x1 smd: 1(0,0) 2(1.75,0)
  silkscreen extent -0.7,-0.6 2.5,0.6
C_0603#2 [mm]
  rect 1.1x1 smd: 1(-0.011,-0.005) 2(1.739,-0.005)
  silkscreen extent -0.71,-0.61 2.49,0.59
C_0603#3 [mm]
  rect 1.1x1 smd: 1(0.01,-0.01) 2(1.76,-0.01)
  silkscreen extent -0.69,-0.61 2.51,0.59
C_0603#4 [mm]
  rect 1.1x1 smd: 1(-0.02,-0.014) 2(1.73,-0.014)
  silkscreen extent -0.72,-0.61 2.48,0.59
C_0603#5 [mm]
  rect 1.1x1 smd: 1(0.01,-0.013) 2(1.76,-0.013)
  silkscreen extent -0.69,-0.61 2.51,0.59
C_0603#6 [mm]
  rect 1.1x1 smd: 1(0.003,0.007) 2(1.753,0.007)
  silkscreen extent -0.7,-0.59 2.5,0.61
C_0603#7 [mm]
  rect 1.1x1 smd: 1(0.011,-0.002) 2(1.761,-0.002)
  silkscreen extent -0.69,-0.6 2.51,0.6
C_0603#8 [mm]
  rect 1.1x1 smd: 1(-0.019,0.002) 2(1.731,0.002)
  silkscreen extent -0.72,-0.6 2.48,0.6
C_0603#9 [mm]
  rect 1.1x1 smd: 1(-0.01,0.006) 2(1.74,0.006)
  silkscreen extent -0.71,-0.59 2.49,0.61
C_0603#10 [mm]
  rect 1.1x1 smd: 1(-0.015,-0.005) 2(1.735,-0.005)
  silkscreen extent -0.72,-0.6 2.48,0.6
C_0603#11 [mm]
  rect 1.1x1 smd: 1(-0.015,0.005) 2(1.735,0.005)
  silkscreen extent -0.72,-0.6 2.48,0.6
C_1210#1 [mil]
  rect 70x100 smd: 1(0,0) 2(137.8,0)
  silkscreen extent -61,-75 187,75
C_1210#2 [mil]
  rect 70x100 smd: 1(-0.24,-0.33) 2(137.56,-0.33)
  silkscreen extent -61,-75 187,74
CN2-3.5-180 [mm]
  rect 2x2.5 hole 1: 1(0,0)
  oval 2x2.5 hole 1: 2(-3.5,0)
  silkscreen extent -5.3,-3.57 1.81,3.55
CON6_2.0 [mm]
  rect 1.27x1.27 hole 0.711: 1(0,0)
  round 1.27 hole 0.711: 2(0,2) 3(2,0) 4(2,2) 5(4,0) 6(4,2)
  silkscreen extent -2,-1.5 6,3.5
CON280_SMD_BOT [mm]
  round 3.2 hole 2.2: 0(-0.203,36.939) 0(58.522,37.015)
  rect 2.5x0.4 smd: 1(0,0) 2(5.2,0) 3(0,0.8) 4(5.2,0.8) 5(0,1.6) 6(5.2,1.6) 7(0,2.4) 8(5.2,2.4) 9(0,3.2) 10(5.2,3.2) 11(0,4) 12(5.2,4) 13(0,4.8) 14(5.2,4.8) 15(0,5.6) 16(5.2,5.6) 17(0,6.4) 18(5.2,6.4) 19(0,7.2) 20(5.2,7.2) 21(0,8) 22(5.2,8) 23(0,8.8) 24(5.2,8.8) 25(0,9.6) 26(5.2,9.6) 27(0,10.4) 28(5.2,10.4) 29(0,11.2) 30(5.2,11.2) 31(0,12) 32(5.2,12) 33(0,12.8) 34(5.2,12.8) 35(0,13.6) 36(5.2,13.6) 37(0,14.4) 38(5.2,14.4) 39(0,15.2) 40(5.2,15.2) 41(0,16) 42(5.2,16) 43(0,16.8) 44(5.2,16.8) 45(0,17.6) 46(5.2,17.6) 47(0,18.4) 48(5.2,18.4) 49(0,19.2) 50(5.2,19.2) 51(0,20) 52(5.2,20) 53(0,20.8) 54(5.2,20.8) 55(0,21.6) 56(5.2,21.6) 57(0,22.4) 58(5.2,22.4) 59(0,23.2) 60(5.2,23.2) 61(0,24) 62(5.2,24) 63(0,24.8) 64(5.2,24.8) 65(0,25.6) 66(5.2,25.6) 67(0,26.4) 68(5.2,26.4) 69(0,27.2) 70(5.2,27.2) 71(0,28) 72(5.2,28) 73(0,28.8) 74(5.2,28.8) 75(0,29.6) 76(5.2,29.6) 77(0,30.4) 78(5.2,30.4) 79(0,31.2) 80(5.2,31.2) 201(58.5,31.2) 202(53.3,31.2) 203(58.5,30.4) 204(53.3,30.4) 205(58.5,29.6) 206(53.3,29.6) 207(58.5,28.8) 208(53.3,28.8) 209(58.5,28) 210(53.3,28) 211(58.5,27.2) 212(53.3,27.2) 213(58.5,26.4) 214(53.3,26.4) 215(58.5,25.6) 216(53.3,25.6) 217(58.515,24.795) 218(53.315,24.795) 219(58.515,23.995) 220(53.315,23.995) 221(58.515,23.195) 222(53.315,23.195) 223(58.515,22.395) 224(53.315,22.395) 225(58.515,21.595) 226(53.315,21.595) 227(58.515,20.795) 228(53.315,20.795) 229(58.515,19.995) 230(53.315,19.995) 231(58.515,19.195) 232(53.315,19.195) 233(58.515,18.395) 234(53.315,18.395) 235(58.515,17.595) 236(53.315,17.595) 237(58.515,16.795) 238(53.315,16.795) 239(58.515,15.995) 240(53.315,15.995) 241(58.515,15.195) 242(53.315,15.195) 243(58.515,14.395) 244(53.315,14.395) 245(58.515,13.595) 246(53.315,13.595) 247(58.515,12.795) 248(53.315,12.795) 249(58.515,11.995) 250(53.315,11.995) 251(58.515,11.195) 252(53.315,11.195) 253(58.515,10.395) 254(53.315,10.395) 255(58.515,9.595) 256(53.315,9.595) 257(58.515,8.795) 258(53.315,8.795) 259(58.515,7.995) 260(53.315,7.995) 261(58.515,7.195) 262(53.315,7.195) 263(58.515,6.395) 264(53.315,6.395) 265(58.515,5.595) 266(53.315,5.595) 267(58.515,4.795) 268(53.315,4.795) 269(58.515,3.995) 270(53.315,3.995) 271(58.515,3.195) 272(53.315,3.195) 273(58.515,2.395) 274(53.315,2.395) 275(58.515,1.595) 276(53.315,1.595) 277(58.515,0.795) 278(53.315,0.795) 279(58.515,-0.005) 280(53.315,0.006)
  rect 0.4x2.5 smd: 81(2.165,46.497) 82(2.165,41.297) 83(2.965,46.497) 84(2.965,41.297) 85(3.765,46.497) 86(3.765,41.297) 87(4.565,46.497) 88(4.565,41.297) 89(5.365,46.497) 90(5.365,41.297) 91(6.165,46.497) 92(6.165,41.297) 93(6.965,46.497) 94(6.965,41.297) 95(7.765,46.497) 96(7.765,41.297) 97(8.565,46.497) 98(8.565,41.297) 99(9.365,46.497) 100(9.365,41.297) 101(10.165,46.497) 102(10.165,41.297) 103(10.965,46.497) 104(10.965,41.297) 105(11.765,46.497) 106(11.765,41.297) 107(12.565,46.497) 108(12.565,41.297) 109(13.365,46.497) 110(13.365,41.297) 111(14.165,46.497) 112(14.165,41.297) 113(14.965,46.497) 114(14.965,41.297) 115(15.765,46.497) 116(15.765,41.297) 117(16.565,46.497) 118(16.565,41.297) 119(17.365,46.497) 120(17.365,41.297) 121(18.171,46.506) 122(18.171,41.306) 123(18.971,46.506) 124(18.971,41.306) 125(19.771,46.506) 126(19.771,41.306) 127(20.571,46.506) 128(20.571,41.306) 129(21.371,46.506) 130(21.371,41.306) 131(22.171,46.506) 132(22.171,41.306) 133(22.971,46.506) 134(22.971,41.306) 135(23.771,46.506) 136(23.771,41.306) 137(24.571,46.506) 138(24.571,41.306) 139(25.371,46.506) 140(25.371,41.306) 141(33.096,46.506) 142(33.096,41.306) 143(33.896,46.506) 144(33.896,41.306) 145(34.696,46.506) 146(34.696,41.306) 147(35.496,46.506) 148(35.496,41.306) 149(36.296,46.506) 150(36.296,41.306) 151(37.096,46.506) 152(37.096,41.306) 153(37.896,46.506) 154(37.896,41.306) 155(38.696,46.506) 156(38.696,41.306) 157(39.496,46.506) 158(39.496,41.306) 159(40.296,46.506) 160(40.296,41.306) 161(41.096,46.506) 162(41.096,41.306) 163(41.896,46.506) 164(41.896,41.306) 165(42.696,46.506) 166(42.696,41.306) 167(43.496,46.506) 168(43.496,41.306) 169(44.296,46.506) 170(44.296,41.306) 171(45.096,46.506) 172(45.096,41.306) 173(45.896,46.506) 174(45.896,41.306) 175(46.696,46.506) 176(46.696,41.306) 177(47.496,46.506) 178(47.496,41.306) 179(48.296,46.506) 180(48.296,41.306) 181(49.096,46.506) 182(49.096,41.306) 183(49.896,46.506) 184(49.896,41.306) 185(50.696,46.506) 186(50.696,41.306) 187(51.496,46.506) 188(51.496,41.306) 189(52.296,46.506) 190(52.296,41.306) 191(53.096,46.506) 192(53.096,41.306) 193(53.896,46.506) 194(53.896,41.306) 195(54.696,46.506) 196(54.696,41.306) 197(55.496,46.506) 198(55.496,41.306) 199(56.296,46.506) 200(56.296,41.306)
  KeepOutLayer circle w0.254: c55.915,33.709 r0.35
  KeepOutLayer circle w0.254: c2.597,-2.507 r0.35
  KeepOutLayer circle w0.254: c2.622,33.739 r0.5
  KeepOutLayer circle w0.254: c55.915,-2.491 r0.5
  KeepOutLayer circle w0.254: c27.872,43.899 r0.5
  KeepOutLayer circle w0.254: c-0.353,43.924 r0.35
  KeepOutLayer circle w0.254: c58.822,43.924 r0.5
  KeepOutLayer circle w0.254: c30.572,43.924 r0.35
  silkscreen extent -2.25,-4.14 60.8,48.92
D1206 [mm]
  rect 1.5x2 smd: 1(0,0) 2(3.5,0)
  silkscreen extent 1.25,-1 2.25,1
DB9RA/M [mil]
  rect 62x62 hole 38: 1(0,0)
  round 62 hole 38: 2(109,0) 3(218,0) 4(327,0) 5(436,0) 6(55,-100) 7(164,-100) 8(273,-100) 9(382,-100)
  round 150 hole 118.11: ""(-275,-50) ""(711,-50)
  silkscreen extent -404,-679 837,79
DC-JACK [mil]
  oval 120x150 hole 102: 1(0,0) 2(229,0)
  oval 150x120 hole 102: 3(103,186)
  silkscreen extent 11,-173 530,173
DIP2_2.0 [mm]
  rect 1.2x2.4 hole 0.9: 1(0.002,0.002)
  oval 1.2x2.4 hole 0.9: 2(2.002,0.002)
  silkscreen extent -2,-2 4,3
DIP4_2.0 [mm]
  rect 1.2x2.4 hole 0.9: 1(0,0)
  oval 1.2x2.4 hole 0.9: 2(2,0) 3(4,0) 4(6,0)
  silkscreen extent -2,-2 8,3
DIP6_1.25 [mil]
  rect 32x50 hole 24: 1(0,0)
  oval 32x50 hole 24: 2(49.21,0) 3(98.42,0) 4(147.64,0) 5(196.85,0) 6(246.06,0)
  silkscreen extent -51,-55 295,56
DIP6_2.0 [mm]
  rect 1.2x2.4 hole 0.9: 1(0.008,0.002)
  oval 1.2x2.4 hole 0.9: 2(2.008,0.002) 3(4.008,0.002) 4(6.008,0.002) 5(8.008,0.002) 6(10.008,0.002)
  silkscreen extent -1.99,-2 12.01,3
DIP8_2.0 [mm]
  rect 1.2x2.4 hole 0.8: 1(-0.012,-0.002)
  oval 1.2x2.4 hole 0.8: 2(1.988,-0.002) 3(3.988,-0.002) 4(5.988,-0.002) 5(7.988,-0.002) 6(9.988,-0.002) 7(11.988,-0.002) 8(13.988,-0.002)
  silkscreen extent -2.01,-2 15.99,3
DM9000AE [mm]
  rect 0.3x1.5 smd: 1(0,0)
  oval 0.3x1.5 smd: 2(0.5,0) 3(1,0) 4(1.5,0) 5(2,0) 6(2.5,0) 7(3,0) 8(3.5,0) 9(4,0) 10(4.5,0) 11(5,0) 12(5.5,0) 25(5.5,9) 26(5,9) 27(4.5,9) 28(4,9) 29(3.5,9) 30(3,9) 31(2.5,9) 32(2,9) 33(1.5,9) 34(1,9) 35(0.5,9) 36(0,9)
  oval 1.5x0.3 smd: 13(7.25,1.75) 14(7.25,2.25) 15(7.25,2.75) 16(7.25,3.25) 17(7.25,3.75) 18(7.25,4.25) 19(7.25,4.75) 20(7.25,5.25) 21(7.25,5.75) 22(7.25,6.25) 23(7.25,6.75) 24(7.25,7.25) 37(-1.75,7.25) 38(-1.75,6.75) 39(-1.75,6.25) 40(-1.75,5.75) 41(-1.75,5.25) 42(-1.75,4.75) 43(-1.75,4.25) 44(-1.75,3.75) 45(-1.75,3.25) 46(-1.75,2.75) 47(-1.75,2.25) 48(-1.75,1.75)
  silkscreen extent -1.75,0 7.25,9
DWK [mm]
  round 0.8 hole 0.3: 1(-2.032,0) 1(-1.778,-2.032) 1(-1.651,2.286) 1(0,-3.048) 1(0,3.048) 1(1.651,2.159) 1(1.778,-2.032) 1(2.032,0)
  round 5 hole 3: 1(0,-1) 1(0,0) 1(0,1)
  silkscreen extent -3.08,-4.02 2.92,3.99
FPC0.5-SMT-40P [mm]
  rect 0.25x1.6 smd: 1(0,0) 2(0.5,0) 3(1,0) 4(1.5,0) 5(2,0) 6(2.5,0) 7(3,0) 8(3.5,0) 9(4,0) 10(4.5,0) 11(5,0) 12(5.5,0) 13(6,0) 14(6.5,0) 15(7,0) 16(7.5,0) 17(8,0) 18(8.5,0) 19(9,0) 20(9.5,0) 21(10,0) 22(10.5,0) 23(11,0) 24(11.5,0) 25(12,0) 26(12.5,0) 27(13,0) 28(13.5,0) 29(14,0) 30(14.5,0) 31(15,0) 32(15.5,0) 33(16,0) 34(16.5,0) 35(17,0) 36(17.5,0) 37(18,0) 38(18.5,0) 39(19,0) 40(19.5,0)
  rect 2x2 smd: A(-2.249,3.489) B(21.751,3.489)
  silkscreen extent -4.9,-2.54 24,5.03
FUSE [mil]
  rect 100x140 smd: 1(0,0) 2(180,0)
  silkscreen extent 0,-80 180,80
HDMI [mm]
  rect 2.5x0.25 smd: 1(0,0)
  oval 2.5x0.25 smd: 2(0,0.5) 3(0,1) 4(0,1.5) 5(0,2) 6(0,2.5) 7(0,3) 8(0,3.5) 9(0,4) 10(0,4.5) 11(0,5) 12(0,5.5) 13(0,6) 14(0,6.5) 15(0,7) 16(0,7.5) 17(0,8) 18(0,8.5) 19(0,9)
  oval 2.5x2 hole 1.3: 20(-7.491,11.75) 21(-7.491,-2.75)
  oval 3.5x2.8 hole 2.3: 22(-1.5,11.75) 23(-1.5,-2.75)
  silkscreen extent -12,-2.75 2.01,11.75
HR911105A [mm]
  rect 1.575x1.575 hole 0.889: 1(0,0)
  round 1.575 hole 0.889: 2(-2.54,1.27) 3(0,2.54) 4(-2.54,3.81) 5(0,5.08) 6(-2.54,6.35) 7(0,7.62) 8(-2.54,8.89)
  round 1.8 hole 1.02: 9(11.25,-2.18) 10(11.25,0.36) 11(11.25,8.53) 12(11.25,11.07)
  round 2.5 hole 1.63: A(3.3,-3.3) B(3.3,12.19)
  round 3.25 hole 3.25: C(6.35,10.16) D(6.35,-1.27)
  silkscreen extent -4.23,-3.55 17.35,12.45
IDC10P_2.00 [mm]
  rect 1.27x1.27 hole 0.7: 1(0,0)
  round 1.27 hole 0.7: 2(-0.011,2.011) 3(1.989,0.011) 4(1.989,2.011) 5(3.989,0.011) 6(3.989,2.011) 7(5.989,0.011) 8(5.989,2.011) 9(7.989,0.011) 10(7.989,2.011)
  silkscreen extent -1.97,-2.02 9.65,3.56
IDC10S [mm]
  rect 1.2x1.2 hole 0.7: 1(0.004,-0.012)
  round 1.2 hole 0.7: 2(0.004,1.988) 3(2.004,-0.012) 4(2.004,1.988) 5(4.004,-0.012) 6(4.004,1.988) 7(6.004,-0.012) 8(6.004,1.988) 9(8.004,-0.012) 10(8.004,1.988)
  silkscreen extent -4.75,-2.03 12.75,3.49
IDC14S_2.0 [mm]
  rect 1.2x1.2 hole 0.7: 1(0,0)
  round 1.2 hole 0.7: 2(0,2) 3(2,0) 4(2,2) 5(4,0) 6(4,2) 7(6,0) 8(6,2) 9(8,0) 10(8,2) 11(10,0) 12(10,2) 13(12,0) 14(12,2)
  silkscreen extent -4.75,-2.25 16.75,3.5
IDC16_DIP_B [mm]
  rect 1.2x1.2 hole 0.7: 1(0.012,-0.012)
  round 1.2 hole 0.7: 2(-1.988,-0.012) 3(0.012,1.988) 4(-1.988,1.988) 5(0.012,3.988) 6(-1.988,3.988) 7(0.012,5.988) 8(-1.988,5.988) 9(0.012,7.988) 10(-1.988,7.988) 11(0.012,9.988) 12(-1.988,9.988) 13(0.012,11.988) 14(-1.988,11.988) 15(0.012,13.988) 16(-1.988,13.988)
  silkscreen extent -26.49,-5.01 2.51,18.99
IDC20S_2.0 [mm]
  rect 1.2x1.2 hole 0.7: 1(0,0)
  round 1.2 hole 0.7: 2(0,2) 3(2,0) 4(2,2) 5(4,0) 6(4,2) 7(6,0) 8(6,2) 9(8,0) 10(8,2) 11(10,0) 12(10,2) 13(12,0) 14(12,2) 15(14,0) 16(14,2) 17(16,0) 18(16,2) 19(18,0) 20(18,2)
  silkscreen extent -4.75,-2.25 22.75,3.5
IDC24P_2.0 [mm]
  rect 1.27x1.27 hole 0.7: 1(0,0)
  round 1.27 hole 0.7: 2(0,2) 3(2,0) 4(2,2) 5(4,0) 6(4,2) 7(6,0) 8(6,2) 9(8,0) 10(8,2) 11(10,0) 12(10,2) 13(12,0) 14(12,2) 15(14,0) 16(14,2) 17(16,0) 18(16,2) 19(18,0) 20(18,2) 21(20,0) 22(20,2) 23(22,0) 24(22,2)
  silkscreen extent -1.96,-2.03 23.94,3.5
IDC40P_2.00 [mm]
  rect 1.27x1.27 hole 0.7: 1(0,0)
  round 1.27 hole 0.7: 2(0,2) 3(2,0) 4(2,2) 5(4,0) 6(4,2) 7(6,0) 8(6,2) 9(8,0) 10(8,2) 11(10,0) 12(10,2) 13(12,0) 14(12,2) 15(14,0) 16(14,2) 17(16,0) 18(16,2) 19(18,0) 20(18,2) 21(20,0) 22(20,2) 23(22,0) 24(22,2) 25(24,0) 26(24,2) 27(26,0) 28(26,2) 29(28,0) 30(28,2) 31(30,0) 32(30,2) 33(32,0) 34(32,2) 35(34,0) 36(34,2) 37(36,0) 38(36,2) 39(38,0) 40(38,2)
  silkscreen extent -1.96,-2.03 39.94,3.5
IRM3638 [mil]
  oval 40x60 hole 30: 1(0,0) 2(100,0) 3(200,0)
  silkscreen extent -30,-143 230,50
LAJITONG [mm]
  silkscreen extent -4.19,-5.11 4.14,6.12
LED_0805#1 [mm]
  rect 1.4x1.27 smd: 1(2.21,0) 2(0,0)
  silkscreen extent -0.8,-0.89 3.01,0.89
LED_0805#2 [mm]
  rect 1.4x1.27 smd: 1(2.202,0) 2(-0.008,0)
  silkscreen extent -0.81,-0.89 3,0.89
MIC [mm]
  rect 1.2x2.4 hole 0.9: 1(0,0)
  oval 1.2x2.4 hole 0.9: 2(2.54,0)
  silkscreen extent -1.73,-3 4.27,3
MINIUSB [mm]
  rect 2.5x0.4 smd: 1(0,0)
  oval 2.5x0.4 smd: 2(0,0.8) 3(0,1.6) 4(0,2.4) 5(0,3.2)
  rect 2.54x1.524 smd: 6(1.25,5.85) 6(1.279,-2.819)
  rect 2.667x1.524 smd: 6(6.5,-2.8) 6(6.5,5.85)
  KeepOutLayer circle w0.254: c3.54,-0.55 r0.7
  KeepOutLayer circle w0.254: c3.54,3.75 r0.7
  silkscreen extent -0.52,-2.55 8.57,5.63
NHDS_4_2.54 [mm]
  rect 3x1.2 smd: 1(0,0) 2(0,-2.54) 3(0,-5.08) 4(0,-7.62) 5(9.144,-7.62) 6(9.144,-5.08) 7(9.144,-2.54) 8(9.144,0)
  silkscreen extent 2.03,-8.89 7.08,1.27
NJM2561F1 [mm]
  rect 1.2x0.5 smd: 1(-0.012,-0.005)
  oval 1.2x0.5 smd: 2(-0.012,-0.955) 3(-0.012,-1.905) 4(2.488,-1.905) 5(2.488,-0.955) 6(2.488,-0.005)
  silkscreen extent 0.76,-2.38 1.71,0.47
OSC2PR-1 [mil]
  round 60 hole 32: 1(0,0) 2(197,0)
  silkscreen extent -123,-92 327,88
PJ-215-B [mm]
  oval 2.2x2.5 hole 1.6: 1(0,0) 2(2.2,2) 3(7.7,2) 10(11.7,0) 11(5.9,0)
  silkscreen extent -5.3,-4 12.9,4.2
R_0603#1 [mm]
  rect 1.1x1 smd: 1(-0.02,-0.002) 2(1.73,-0.002)
  silkscreen extent -0.02,-0.6 1.68,0.6
R_0603#2 [mm]
  rect 1.1x1 smd: 1(0,0) 2(1.75,0)
  silkscreen extent 0,-0.6 1.7,0.6
R_0603#3 [mm]
  rect 1.1x1 smd: 1(-0.008,0.011) 2(1.742,0.011)
  silkscreen extent -0.01,-0.59 1.69,0.61
R_0603#4 [mm]
  rect 1.1x1 smd: 1(0.011,0.002) 2(1.761,0.002)
  silkscreen extent 0.01,-0.6 1.71,0.6
R_0603#5 [mm]
  rect 1.1x1 smd: 1(-0.002,0.005) 2(1.748,0.005)
  silkscreen extent 0,-0.59 1.7,0.61
R_0603#6 [mm]
  rect 1.1x1 smd: 1(0.021,-0.005) 2(1.771,-0.005)
  silkscreen extent 0.02,-0.61 1.72,0.59
R_0603#7 [mm]
  rect 1.1x1 smd: 1(-0.022,-0.022) 2(1.728,-0.022)
  silkscreen extent -0.02,-0.62 1.68,0.58
R_0603#8 [mm]
  rect 1.1x1 smd: 1(-0.01,-0.011) 2(1.74,-0.011)
  silkscreen extent -0.01,-0.61 1.69,0.59
R_0603#9 [mm]
  rect 1.1x1 smd: 1(0.021,0.005) 2(1.771,0.005)
  silkscreen extent 0.02,-0.6 1.72,0.6
RESD1 [mil]
  round 60 hole 30: 1(0.21,-0.31) 2(200.21,-0.31)
  rect 60x55.68 smd: 1(40.21,-0.31) 2(160.21,-0.31)
  rect 31.5x31.5 smd rot 45: 1(70.21,-0.31) 2(130.21,-0.31)
  silkscreen extent -59,-60 259,59
RP2 [mm]
  oval 2x1.6 hole 1.2: 1(0,0) 2(5.5,-2.5) 3(0,-5.048)
  silkscreen extent -1.5,-6 5.5,1
RST_KEY [mm]
  round 1.6 hole 0.9: 1(0,0) 2(4.8,0)
  oval 2.2x1.6 hole 1.4: A(6.05,-2.75) B(-1.25,-2.75)
  silkscreen extent -1.25,-3.75 6.05,3.65
S9013SMD#1 [mil]
  rect 40x50 smd: B(-38,-85) C(0,0) E(37,-85)
  silkscreen extent -58,-45 57,-5
S9013SMD#2 [mil]
  rect 40x50 smd: B(-37.5,-84.99) C(0.5,0.01) E(37.5,-84.99)
  silkscreen extent -58,-45 57,-5
SD-5011 [mm]
  rect 2.8x1 smd: 1(0,0) 2(0,-2.5) 3(0,-5.8) 4(0,-7.4) 5(0,-9.9) 6(0,-12.4) 7(0,-14.8) 8(0,-16.5) 9(0,2.5) 11(0,-4.1)
  rect 2.8x1.2 smd: 10(0,-19.9)
  rect 3x3.5 smd: 13(22.8,-22) 14(21.8,8)
  round 2 hole 2: ""(24.946,5.1) ""(25.2,5.1)
  round 1.5 hole 1.5: ""(25.046,-19.1)
  silkscreen extent 1.8,-21.25 30.05,7.5
SIP2_2.0 [mm]
  rect 1.4x1.4 hole 0.8: 1(0,0)
  round 1.4 hole 0.8: 2(2,0)
  silkscreen extent -0.98,-1 3.02,1
SMBJ_SMD [mm]
  rect 3x3 smd: 1(0,0) 2(-4.5,0)
  silkscreen extent -4.55,-2 0,2
SOP8 [mm]
  rect 2x0.55 smd: 1(0.011,-0.009)
  oval 2x0.55 smd: 2(0.011,-1.279) 3(0.011,-2.549) 4(0.011,-3.819) 5(6.011,-3.819) 6(6.011,-2.549) 7(6.011,-1.279) 8(6.011,-0.009)
  silkscreen extent 1.8,-4.45 4.23,0.63
SOP-8 [mm]
  rect 1.5x0.635 smd: 1(-0.006,0.012) 2(-0.006,-1.258) 3(-0.006,-2.528) 4(-0.006,-3.798) 5(5.994,-3.798) 6(5.994,-2.528) 7(5.994,-1.258) 8(5.994,0.012)
  silkscreen extent 0.99,-4.49 4.99,0.7
SOT23-3 [mm]
  rect 0.8x1.2 smd: 1(0.006,-0.03) 2(2.006,-0.03) 3(1.006,2.745)
  silkscreen extent -0.52,0.65 2.56,2.05
SSOP16#1 [mil]
  oval 80x24 smd: 1(-0.03,0.18) 2(-0.03,-49.82) 3(-0.03,-99.82) 4(-0.03,-149.82) 5(-0.03,-199.82) 6(-0.03,-249.82) 7(-0.03,-299.82) 8(-0.03,-349.82) 9(219.97,-349.82) 10(219.97,-299.82) 11(219.97,-249.82) 12(219.97,-199.82) 13(219.97,-149.82) 14(219.97,-99.82) 15(219.97,-49.82) 16(219.97,0.18)
  silkscreen extent 60,-350 160,25
SSOP16#2 [mil]
  oval 80x24 smd: 1(0,0) 2(0,-50) 3(0,-100) 4(0,-150) 5(0,-200) 6(0,-250) 7(0,-300) 8(0,-350) 9(220,-350) 10(220,-300) 11(220,-250) 12(220,-200) 13(220,-150) 14(220,-100) 15(220,-50) 16(220,0)
  silkscreen extent 60,-350 160,25
SSOP-28 [mm]
  oval 1.6x0.3 smd: 1(0,0) 2(0,-0.635) 3(0,-1.27) 4(0,-1.905) 5(0,-2.54) 6(0,-3.175) 7(0,-3.81) 8(0,-4.445) 9(0,-5.08) 10(0,-5.715) 11(0,-6.35) 12(0,-6.985) 13(0,-7.62) 14(0,-8.255) 15(6.096,-8.255) 16(6.096,-7.62) 17(6.096,-6.985) 18(6.096,-6.35) 19(6.096,-5.715) 20(6.096,-5.08) 21(6.096,-4.445) 22(6.096,-3.81) 23(6.096,-3.175) 24(6.096,-2.54) 25(6.096,-1.905) 26(6.096,-1.27) 27(6.096,-0.635) 28(6.096,0)
  silkscreen extent 1.14,-9.06 4.9,0.7
SW [mm]
  oval 2x3 hole 1.2: 1(2.996,-0.008) 2(-0.004,-0.008) 3(5.996,-0.008)
  oval 3x4 hole 1.5: 4(-3.504,-1.008) 5(9.496,-1.008)
  silkscreen extent -3.5,-11.97 9.5,1.49
SW-PB2 [mm]
  rect 1.2x2.5 smd: 1(0,0) 2(0,-7)
  silkscreen extent -2,-6.75 2,-0.25
TO-92 [mm]
  rect 0.8x1.5 hole 0.6: 1(3.048,0)
  oval 0.8x1.5 hole 0.6: 2(1.269,0.001) 3(-0.508,0)
  silkscreen extent -1.72,-2.45 4.28,2.03
TO-252 [mm]
  rect 1.4x2 smd: 1(0,0) 2(2.311,0) 3(4.623,0)
  rect 7x9 smd: 4(2.3,7.3)
  silkscreen extent -1.72,1.52 6.26,7.51
TV [mm]
  round 4 hole 2.4: 1(0,0) 2(-4.896,0)
  KeepOutLayer lines w0.254: -9,-5.25 -6.75,-5.25 -6.75,-3 -9,-3 -9,-5.25 ; -8.7,3 -6.5,3 -6.5,5.25 -8.7,5.25 -8.7,3
  silkscreen extent -17.8,-5 0.7,5
USBA_2 [mm]
  oct 1.6x1.6 hole 0.92: 1(0,0)
  round 1.6 hole 0.92: 2(2.5,0) 3(4.5,0) 4(7,0) 5(0,2.62) 6(2.5,2.62) 7(4.5,2.62) 8(7,2.62)
  round 3.3 hole 2.2: 9(-4,2.99) 9(-3.5,2.99) 10(10.5,2.99) 10(11,2.99) 11(-4,-2.69) 11(-3.5,-2.69) 12(10.5,-2.69) 12(11,-2.69)
  silkscreen extent -4,-13.38 11,4.87
WEN [mm]
  silkscreen extent -7.45,-5.83 7.08,6.16
WM8960 [mm]
  oval 1x0.25 smd: 1(0,0) 2(0,-0.5) 3(0,-1) 4(0,-1.5) 5(0,-2) 6(0,-2.5) 7(0,-3) 8(0,-3.5) 17(4.95,-3.5) 18(4.95,-3) 19(4.95,-2.5) 20(4.95,-2) 21(4.95,-1.5) 22(4.95,-1) 23(4.95,-0.5) 24(4.95,0)
  oval 0.25x1 smd: 9(0.725,-4.225) 10(1.225,-4.225) 11(1.725,-4.225) 12(2.225,-4.225) 13(2.725,-4.225) 14(3.225,-4.225) 15(3.725,-4.225) 16(4.225,-4.225) 25(4.225,0.725) 26(3.725,0.725) 27(3.225,0.725) 28(2.725,0.725) 29(2.225,0.725) 30(1.725,0.725) 31(1.225,0.725) 32(0.725,0.725)
  rect 3.45x3.45 smd: 33(2.5,-1.75)
  silkscreen extent -0.25,-4.25 5,1

## Free pads (board coordinates)
  round 5 hole 3.2: 2(1073.506,1587.088) 2(1073.506,1663.923) 2(1190.092,1587.088) 2(1190.092,1663.923) 2(1194.5,1625.6)

## Via types
v1: diameter 1, hole 0.5, TopLayer to BottomLayer, 458 vias
v2: diameter 0.8, hole 0.4, TopLayer to BottomLayer, 172 vias